# Altium PCB Copy of PCB1.PcbDoc (part 2 of 4)
Units mm, origin at the board's own origin, x right, y up, seen from the top; angles counter-clockwise.
Board outline 200 x 135 mm, 2 copper layers (Top Layer, Bottom Layer); 350 components, 150 nets, 843 pads, 244 vias.
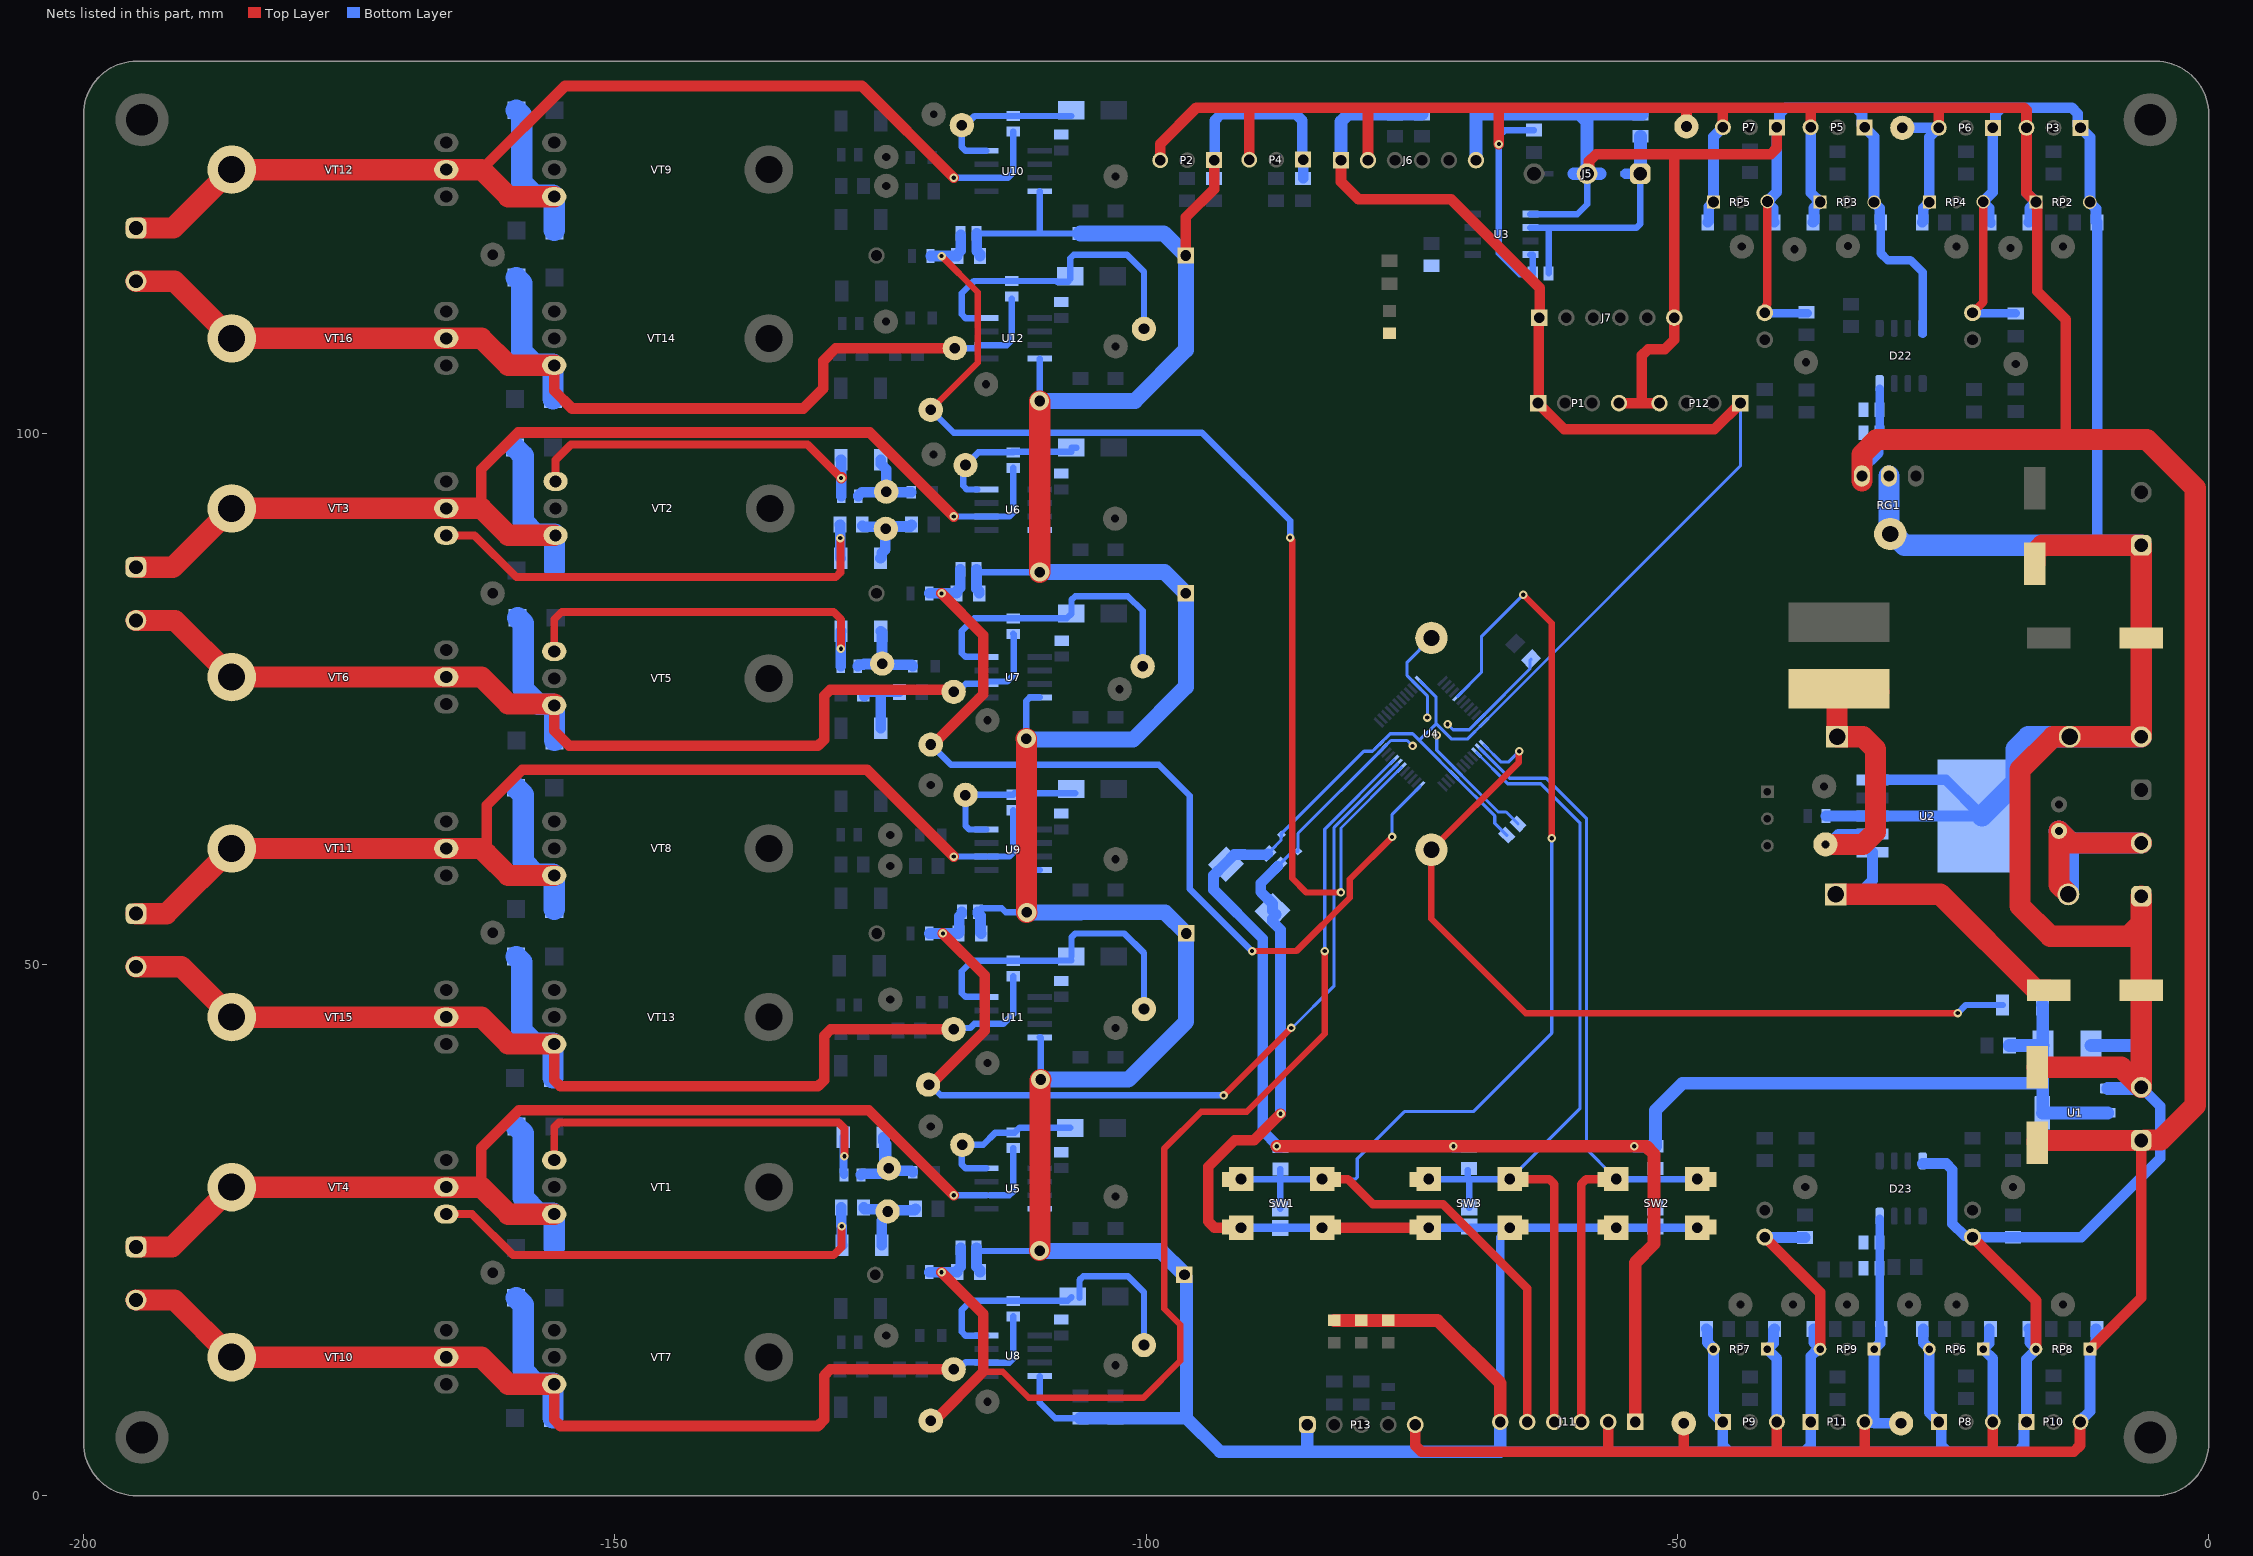
[diagram p2: the nets of this part, all layers, seen from the top]

## Part data
C1: library part CMP-04424-000193-1, "47uF 16V  ±20% 500mΩ 2312  SMD Tantalum Capacitor", Capacitance=47uF, Case Code (Imperial)=2312, Case Code (Metric)=6032, Case/Package=6032-28, ESR (Equivalent Series Resistance)=500mR, Leakage Current=7.5uA, Max Operating Temperature=125°C, Min Operating Temperature=-55°C, Package Quantity=1, Tolerance=20%, Voltage Rating=16V, Construction=Flat, Depth=3.2mm, Dissipation Factor=6%, Features="General Purpose", Height=2.8mm, Height - Seated (Max)=0.11inch, Lead Free="Lead Free", Length=6mm, Mount="Surface Mount", Number of Pins=2, Packaging="Tape and Reel", Polarity=Polar, Radiation Hardening=No, REACH SVHC="No SVHC", RoHS Compliant=Yes, Series=TAJ, Termination=SMD/SMT, Voltage Rating (DC)=16V, Width=3.2mm
C2 C3: library part CMP-05427-000015-1, "CAP ALUM 100UF 20% 50V SMD", Capacitance=100uF, Leakage Current=100uA, Manufacturer=Panasonic, Package=SF, Ripple Current=200mA, Temperature="-40°C to +85°C", Temperature Range High=+85°C, Temperature Range Low=-40°C, Tolerance=20%, Voltage=50V, Automotive=Yes, Automotive Grade="Grade 3", Category=Cap, ComponentLink2Description=Datasheet, ComponentLink2URL=https://industrial.panasonic.com/cdbs/www-data/pdf/RDE0000/ABA0000C1145.pdf, Device Class L1="Passive Components", Device Class L2=Capacitors, Device Class L3="Aluminum Electrolytic Capacitors", Digikey Description="CAP ALUM 100UF 20% 50V SMD", Dissipation Factor=0.12%, Height=10.5mm, Lead Free=Yes, Life=2000Hours, Manufacturer Part Number=EEE-1HA101UP, Material=Aluminum, Mouser Description="Cap Aluminum Lytic 100uF 50V 20% (8 X 10.2mm) SMD 200mA 2000h 85C Automotive T/R", Octopart=https://octopart.com/eee-1ha101up-panasonic-55396734, RoHS=TRUE, Voltage Rating=50V
C4 C5: "Capacitor Polarised", Manufacturer_Name=Panasonic, Datasheet Link=http://industrial.panasonic.com/cdbs/www-data/pdf/RDE0000/ABA0000C1142.pdf, Manufacturer_Part_Number=EEE1HA101AP
C6: "Capacitor Polarised", Manufacturer_Name=Vishay, Mouser Part Number=74-293D106X9050E2TE3, Arrow Part Number=293D106X9050E2TE3, Arrow Price/Stock=https://www.arrow.com/en/products/293d106x9050e2te3/vishay, Datasheet Link=http://www.vishay.com/doc?40002, Height=4.3mm, Manufacturer_Part_Number=293D106X9050E2TE3, Mouser Price/Stock=https://www.mouser.com/Search/Refine.aspx?Keyword=74-293D106X9050E2TE3
C7 C9 C11 C12 C13 C14 C15 C16: library part CMP-2007-03453-2, "Chip Multilayer Ceramic Capacitors for General Purpose, 0805, 10uF, X5R, 15%, 10%, 16V", Capacitance=10uF, Case Code (Imperial)=0805, Case Code (Metric)=2012, Dielectric=X5R, Max Operating Temperature=85°C, Min Operating Temperature=-55°C, Package Quantity=1, Tolerance=10%, Voltage=16V, Case/Package=0805, Depth=1.25mm, Height=1.25mm, Lead Free="Lead Free", Length=2mm, Material=Ceramic, Mount="Surface Mount", Packaging="Tape and Reel", Radiation Hardening=No, REACH SVHC="No SVHC", Termination=SMD/SMT, Thickness=0.053inch, Voltage Rating=16V, Voltage Rating (DC)=16V, Width=1.25mm
C8 C10 C17 C18 C19 C20 C21 C22 C23 C24 C25 C26 C27 C28 C29 C30 C31 C32 C33 C34 C35 C36: library part CMP-1036-04552-2, "CAP CER 0.22UF 50V X7R 0805", Capacitance="0.22 μF", Manufacturer=KEMET, Package=C0805C-DN, Temperature="-55°C to +125°C", Temperature Characteristic=X7R, Temperature Coefficient=30ppm/°C, Temperature Range High=+125°C, Temperature Range Low=-55°C, Tolerance=0.1, Voltage Rating="50 V", Automotive=No, Category=Cap, ComponentLink2Description=Datasheet, ComponentLink2URL=https://content.kemet.com/datasheets/KEM_C1003_C0G_SMD.pdf, Device Class L1="Passive Components", Device Class L2=Capacitors, Device Class L3="Ceramic Capacitors", Digikey Description="CAP CER 0.22UF 50V X7R 0805", Height=0.88mm, Ipc Land Pattern Name=CAPC200125X78, Lead Free=Yes, Manufacturer Part Number=C0805C224K5RACTU, Material=Ceramic, Mouser Description="CAP CER 0.22UF 50V X7R 0805", Octopart=https://octopart.com/c0805c224k5ractu-kemet-144670, RoHS=TRUE
CR1 CR2 U4: "No Description Available", Mfr_Name=STMicroelectronics, RefDes=RefDes
  CR1 CR2: Copyright="Copyright (C) 2022 Ultra Librarian. All rights reserved.", Manufacturer_Part_Number=1N5822RL, Type=DEV
  U4: Type=Type
D1 D2 D6 D10 D11 D12 D19 D20: library part CMP-12791-000009-1, "DIODE GEN PURP 400V 1A SMA", Capacitance=20pF, Forward Current=1A, Manufacturer="Diodes Inc.", Max Junction Temp=+150°C, Max Repetitive Reverse Voltage=400V, Max Surge Forward Current=30A, Package=SMA, Peak Reverse Current=5uA, Temperature="-65°C to +150°C", Temperature Range Low=-65°C, Automotive=No, Category=Diode, ComponentLink2Description=Datasheet, ComponentLink2URL=https://www.diodes.com/assets/Datasheets/ds16008.pdf, Device Class L1="Discrete Semiconductors", Device Class L2=Diodes, Device Class L3="Rectifier Diodes", Digikey Description="DIODE GEN PURP 400V 1A SMA", Footprint Url=https://www.diodes.com/assets/Package-Files/SMA.pdf, Height=2.4mm, Lead Free=Yes, Manufacturer Part Number=US1G-13-F, Mouser Description="Rectifiers 400V 1A", Octopart=https://octopart.com/us1g-13-f-diodes+inc.-334651, Reverse Voltage=400V, RoHS=TRUE, Standoff Height=0.05mm, Temperature Range High=+150°C
D3 D4 D5 D7 D8 D9 D13 D14 D15 D16 D17 D18 D21 D24 D25 D26 D27: library part CMP-249167-000001-1, "DIODE GEN PURP 75V 150MA SOD80", Capacitance=4pF, Forward Current=300mA, Manufacturer="Vishay Small Signal", Max Junction Temp=+175°C, Max Repetitive Reverse Voltage=100V, Max Surge Forward Current=2A, Package=6.560-5005.01-4, Peak Reverse Current=5uA, Reverse Voltage=75V, Temperature="to +175°C", Automotive=Yes, Automotive Grade="Grade 0", Category=Diode, ComponentLink2Description=Datasheet, ComponentLink2URL=http://www.vishay.com/docs/85557/ll4148.pdf, Device Class L1="Discrete Semiconductors", Device Class L2=Diodes, Device Class L3="Rectifier Diodes", Digikey Description="DIODE GEN PURP 75V 150MA SOD80", Height=1.6mm, Lead Free=Yes, Manufacturer Part Number=LL4448-GS08, Mouser Description="Diodes - General Purpose, Power, Switching 100 Volt 100mA", Octopart=https://octopart.com/ll4448-gs08-vishay+small+signal-40886, RoHS=TRUE, Temperature Range High=+175°C
D22 D23: "Микросхема сдвоенный ОУ", Package=8-SOIC, ComponentDescription="Микросхема сдвоенный ОУ, LMV358AIDR, 8-SOIC", ComponentTypе="Микросхема сдвоенный ОУ"
D28 D32 D33 D34 D35 D36 D37 D38 D39 D40 D41 D42 D43 D44 D45 D46: library part CMP-02540-000074-1, "DIODE GEN PURP 1KV 1A DO214BA", Average Rectified Current=1A, Case/Package=DO-214BA, Forward Voltage=1.2V, Max Forward Surge Current (Ifsm)=30A, Max Operating Temperature=175°C, Max Repetitive Reverse Voltage (Vrrm)=1kV, Max Reverse Current=5uA, Min Operating Temperature=-65°C, Package Quantity=1, Element Configuration=Single, Forward Current=1A, Height=2.74mm, Lead Free="Lead Free", Length=4.75mm, Max Reverse Voltage (DC)=1kV, Max Surge Current=30A, Mount="Surface Mount", Number of Pins=2, Packaging="Tape and Reel", Peak Non-Repetitive Surge Current=30A, Radiation Hardening=No, Recovery Time=3000ns, Reverse Recovery Time=2us, Reverse Recovery Time-Max=2s, Reverse Voltage=1kV, RoHS Compliant=Yes, Series=SUPERECTIFIER®, Width=2.9mm
D29 D30 D31 D47: "WURTH ELEKTRONIK - 151031YS06000 - LED, Yellow, Through Hole, T-1 (3mm), 30 mA, 2 V, 590 nm", Manufacturer_Name="Wurth Elektronik", Mouser Part Number=710-151031YS06000, Datasheet Link=https://katalog.we-online.de/led/datasheet/151031YS06000.pdf, Geometry.Height=5.5mm, Manufacturer_Part_Number=151031YS06000, Mouser Price/Stock=https://www.mouser.co.uk/ProductDetail/Wurth-Elektronik/151031YS06000?qs=LlUlMxKIyB3xSYYW%252BcuBiQ%3D%3D
D48: library part CMP-14400-000025-1, "DIODE ZENER 5.1V 300MW SOD323"
J1 J2 J3 J4 J8 J9 J10 J13: "WR-TBL Series 101 Horizontal Entry Modular, THT, pitch 5mm, 2p", Manufacturer="Wurth Elektronik", Operating Temperature Max=105°C, Operating Temperature Min=-40°C, Rated Current=16A, Working Voltage=250V, Application="Pressure Clamp", Category="Terminal Blocks", ComponentLink1Description="Website Link", ComponentLink1URL=https://www.we-online.com/redexpert/article/691101710002?ad, ComponentLink2Description="Datasheet Link", ComponentLink2URL=https://www.we-online.com/redexpert/spec/691101710002?ad, Manufacturer Part Number=691101710002, Match Code=WR-TBL, Modularity=Yes, Mount="Through Hole", Number of Pins=2, Number of Rows=1, Orientation=Horizontal, Packaging=Box, Pitch=5mm
J5: "WR-TBL Series 101 Horizontal Entry Modular, Through Hole, pitch 5mm, 3p", Manufacturer="Wurth Elektronik", Operating Temperature Max=105°C, Operating Temperature Min=-40°C, Rated Current=16A, Working Voltage=250V, Application="Pressure Clamp", Category="Terminal Blocks", ComponentLink1Description="Manufacturer Link", ComponentLink1URL=https://www.we-online.com/redexpert/article/691101710003?ad, ComponentLink2Description=Datasheet, ComponentLink2URL=https://www.we-online.com/redexpert/spec/691101710003?ad, Manufacturer Part Number=691101710003, Match Code=WR-TBL, Modularity=Yes, Mount="Through Hole", Orientation=Horizontal, Packaging=Box, PCB/Cable/Panel=PCB, Pin Number=3, Pitch=5mm
L1: library part 744776122, "WE-PD2 SMT Power Inductor, size 1054, 22µH, 2.04A, 0.1Ω", Case/Size Code=1054, DC Resistance=0.051Ω, DC Resistance Max=0.1Ω, Inductance=22µH, Manufacturer="Wurth Elektronik", Operating Temperature Max=125°C, Operating Temperature Min=-40°C, Rated Current=2.04A, Saturation Current=2.07A, Self Resonant Frequency=16MHz, Category="Unshielded Power Inductors", ComponentLink1Description="Website Link", ComponentLink1URL=https://www.we-online.com/redexpert/article/744776122?ad, ComponentLink2Description="Datasheet Link", ComponentLink2URL=https://www.we-online.com/redexpert/spec/744776122?ad, Height=5.4mm, Length=10mm, Manufacturer Part Number=744776122, Match Code=WE-PD2, Mount="Surface Mount", Packaging="Tape and Reel", Width=9mm
LED1 LED2 LED3 LED4: "THT LED round mono-color waterclear, WL-TMRW , Blue", Emitting color=Blue, Manufacturer="Wuerth Elektronik", ComponentLink1Description="Manufacturer URL", ComponentLink1URL=http://www.we-online.com, ComponentLink2Description=Datasheet, ComponentLink2URL=http://katalog.we-online.de/pbs/datasheet/7448042001.pdfhttp://katalog.we-online.de/pbs/datasheet/7448042001.pdfhttp://katalog.we-online.de/pbs/datasheet/7448042001.pdfhttp://katalog.we-online.de/pbs/datasheet/151033BS03000.pdf, PackageReference="Type 3mm", PartNumber=151033BS03000
P1 P12: library part CMP-1024-00357-1, "0.025\" SQ Post Header, Through-hole, Vertical, -55 to 125 degC, 2.54 mm Pitch, 4-Pin, Male, RoHS", Manufacturer=Samtec, Temperature Range="-55 to 125 degC", ComponentLink1Description="Manufacturer URL", ComponentLink1URL=http://www.samtec.com, ComponentLink2Description=Datasheet, ComponentLink2URL=http://www.samtec.com/documents/webfiles/pdf/TSW_TH.PDF, ComponentLink3Description="Package Specification", ComponentLink3URL=http://www.samtec.com/documents/webfiles/cpdf/TSW-XXX-XX-XXX-X-XX-XXX-MKT.pdf, DatasheetVersion=F-214, Mounting Technology=Through-hole, Orientation=Vertical, PackageDescription=".025[0.64] SQ. Post Terminal Strip Assembly", PackageReference=TSW-104-08-X-S, PackageVersion="DM, 8/1988", PartNumber=TSW-104-08-G-S, Pitch="2.54 mm", RoHS=True
P2 P3 P4 P5 P6 P7 P8 P9 P10 P11: "WR-WTB THT Male Vertical Locking Header, pitch 2.54mm, 3p", Contact Resistance=20mOhm, Operating Temperature="-40 to +105degC", Rated Current=3A, Withstanding Voltage=1000VAC, Working Voltage=250VAC, ComponentLink1Description=Manufacturer, ComponentLink1URL=http://www.we-online.de, ComponentLink2Description=Datasheet, ComponentLink2URL=https://www.we-online.com/catalog/datasheet/61900311121.pdf, Gender=Male, Mounting Technology=THT, Packaging=Bag, Part Number=61900311121, Pin Number=3, Pitch=2.54mm, Published Date="January 2020", Publisher="Wurth Elektronik", Type=Vertical
P13: "WR-PHD Pin Header, THT, Vertical, pitch 2.54mm, 1 Row, 5P", Contact Resistance=20mΩ, Manufacturer="Wurth Elektronik", Operating Temperature Max=105°C, Operating Temperature Min=-40°C, Rated Current=3A, Withstanding Voltage=500V, Working Voltage=250V, Category="Board-to-Board Connectors", ComponentLink1Description="Website Link", ComponentLink1URL=https://www.we-online.com/redexpert/article/61300511121?ad, ComponentLink2Description="Datasheet Link", ComponentLink2URL=https://www.we-online.com/redexpert/spec/61300511121?ad, Gender="Pin Header", Manufacturer Part Number=61300511121, Match Code=WR-PHD, Mount="Through Hole", Number of Pins=5, Number of Rows=1, Orientation=Vertical, Packaging=Bag, Pitch=2.54mm
R1 R2 R10 R12 R15 R16 R17 R23 R25 R26 R27 R28 R37 R45 R46 R48 R49 R51 R52 R53 R54 R55 R56 R57 R58 R59 R60 R66 R67 R71 R72 R73 R74 R76 R77 R79 R81 R83 R84 R85 R86 R87 R88 R93 R94 R97 R99 R100 R101 R102 R103 R104 R105 R106: library part CRCW08050000Z0EA
R3 R4 R5 R8 R9 R20 R22 R30 R33 R35 R36 R38 R39 R61 R62 R63 R64 R69 R70 R89 R90 R91 R92 R95 R96 R108 R110 R112 R113 R114 R115 R119: library part RC0805FR-07100KL
R6 R7 R11 R14 R19 R21 R31 R34 R41 R42 R43 R44 R65 R68 R75 R78: library part CMP-03412-028725-1, "RES SMD 10 OHM 1% 1/8W 0805", Manufacturer=Yageo, Package=RT0805, Power Rating=0.125W, Resistance=10Ω, Temperature="-55°C to +155°C", Temperature Coefficient="50 ppm/°C", Temperature Range High=+155°C, Temperature Range Low=-55°C, Tolerance=0.0001, Voltage Rating=150V, Automotive=No, Category=Res, ComponentLink2Description=Datasheet, ComponentLink2URL=http://www.yageo.com/documents/recent/PYu-RT_1-to-0.01_RoHS_L_9.pdf, Composition="Thin Film", Device Class L1="Passive Components", Device Class L2=Resistors, Device Class L3="Chip SMD Resistors", Digikey Description="RES SMD 10 OHM 1% 1/8W 0805", Footprint Url=http://www.yageo.com/exep/pages/download/literatures/PYu-R_Mount_10.pdf, Height=0.6mm, Ipc Land Pattern Name=RESC200125X50, Lead Free=Yes, Manufacturer Part Number=RT0805FRE0710RL, Mouser Description="High Precision-High Stability Chip Resistor Thin Film 0805 10Ohm 1% Paper T/R", Octopart=https://octopart.com/rt0805fre0710rl-yageo-39855890, RoHS=TRUE, Series=RT
R13 R18 R24 R40 R47 R50 R80 R82 R98 R116 R117 R118: library part CMP-2001-04908-2, "RES Thick Film, 10kΩ, 1%, 0.125W, 100ppm/°C, 0805", Case Code (Imperial)=0805, Case Code (Metric)=2012, Max Operating Temperature=155°C, Min Operating Temperature=-55°C, Package Quantity=5000, Power Rating=125mW, Resistance=10kR, Temperature Coefficient=100ppm/°C, Tolerance=1%, Voltage Rating=150V, Case/Package=0805, Composition="Thick Film", Contact Plating=Tin, Depth=1.25mm, Height=0.45mm, Lead Free="Lead Free", Length=2mm, Military Standard=Not, Packaging="Tape and Reel", Radiation Hardening=No, Termination=SMD/SMT, Voltage Rating (DC)=150V, Weight=0.000194oz, Width=1.25mm
R29 R32 R107 R109: library part CMP-03413-000003-1, "RES 1.2 OHM 5W 5% AXIAL", Manufacturer=Yageo, Manufacturer Part Number=SQP500JB-1R2, Package=SQP500, Power Rating=5W, Resistance=1.2Ω, Temperature="-55°C to +155°C", Temperature Coefficient=300ppm/°C, Temperature Range High=+155°C, Temperature Range Low=-55°C, Tolerance=5%, Voltage Rating=350V, Automotive=No, Category=Res, ComponentLink2Description=Datasheet, ComponentLink2URL=https://datasheet.ciiva.com/2723/yageolr-sqpnsp-2013-2723111.pdf, Composition=Wirewound, Device Class L1="Passive Components", Device Class L2=Resistors, Device Class L3="Through-Hole Resistors", Digikey Description="RES 1.2 OHM 5W 5% AXIAL", Height=10mm, Ipc Land Pattern Name=RESAD2911W100L2350D1050, Lead Free=Yes, Octopart=https://octopart.com/sqp500jb-1r2-yageo-1162571, RoHS=TRUE, Series=SQP
R111: library part RC0805FR-07100KL, "2.2K"
RG1: "REG IC REG LINEAR 5V 1A TO220AB", Current-Output=1A, Digikey Part Number=LM7805CT-ND, Manufacturer=Fairchild, Mouser Part Number=512-LM7805CT, Package=TO220, Part Number=LM7805CT, Temperature="-40°C to +125°C", Temperature Range High=+125°C, Temperature Range Low=-40°C, Voltage - Input (Max)=35V, Voltage - Output=5V, Voltage Dropout (Max)="2V @ 1A (Typ)", ComponentLink1Description=Upverter, ComponentLink1URL=https://upverter.com/upn/revision/b27a7358b7dd93a3/, ComponentLink2Description=Datasheet, ComponentLink2URL=https://www.fairchildsemi.com/datasheets/LM/LM7805.pdf, Digikey Description="REG IC REG LINEAR 5V 1A TO220AB", helpURL=https://upverter.com/upn/revision/b27a7358b7dd93a3/, Ipc Land Pattern Name=TO-220, Lead Free=yes, Price=0.384521982769, RoHS=TRUE, Supplier 1=Digi-Key, Supplier 2=Mouser, Supplier Part Number 1=LM7805CT-ND, Supplier Part Number 2=512-LM7805CT
RP1 RP2 RP3 RP4 RP5 RP6 RP7 RP8 RP9: library part 3296W-1-202LF
SW1 SW2 SW3: "No Description Available", Mfr_Name="TE Connectivity", Copyright="Copyright (C) 2022 Ultra Librarian. All rights reserved.", Manufacturer_Part_Number=4-1437565-2, RefDes=RefDes, Type=DEV
TP1 TP2 TP3 TP4 TP5 TP6 TP7 TP8 TP9 TP10 TP11 TP12 TP13 TP14 TP15 TP16 TP17 TP18 TP19 TP20 TP21 TP22 TP23 TP24 TP25 TP26 TP27 TP28 TP29 TP30 TP31 TP32 TP33 TP34 TP35 TP36 TP37 TP38 TP39 TP40 TP41 TP42 TP43 TP44 TP45 TP46 TP47 TP48 TP49 TP50 TP51 TP52 TP53 TP54 TP55 TP56 TP57 TP58 TP59 TP60 TP61 TP62 TP63 TP64 TP65 TP66 TP67 TP68 TP69 TP70: library part TP_PCB?, "Test_Point"
U1: library part CMP-0062-01639-4, "800mA Low-Dropout Linear Regulator, 4-pin SOT-223, Pb-Free", Manufacturer="Texas Instruments", PackageTopMarking=XYTT*N05A, PowerWise=N, Code_IPC=SOT223-4, Code_JEDEC=TO-261-AA, ComponentLink1Description="Datasheet URL", ComponentLink1URL=http://www.ti.com/general/docs/lit/getliterature.tsp?genericPartNumber=LM1117-N&fileType=pdf, CompType="LDO IC", High-Reliability=Y, PackageDescription="Molded SOT-223, 6.50 x 3.56 x 1.6mm Body, 4 Lead, 2.3mm Pitch", PackageReference=DCY0004A, PartNumber=LM1117MPX-3.3/NOPB, PinCount=4, RoHS=Y
U2: library part LM2576D2T-005G
U5 U6 U7 U8 U9 U10 U11 U12: "No Description Available", Mfr_Name=Infineon, Copyright="Copyright (C) 2023 Ultra Librarian. All rights reserved.", Manufacturer_Part_Number=IR2104SPBF, RefDes=RefDes, Type=DEV
VT1 VT2 VT3 VT4 VT5 VT6 VT7 VT8 VT9 VT10 VT11 VT12 VT13 VT14 VT15 VT16: "Транзистор МОП, одиночный, N-канальный", Package=TO-220(bend2), ChannelType=N-канальный, ComponentDescription="Транзистор МОП, одиночный, N-канальный, IRF3205, TO-220(bend2)", ComponentType="Транзистор МОП, одиночный"
Z1 Z2: "Zener Diode", Manufacturer_Name=onsemi, Mouser Part Number=863-MM3Z5V1ST1G, Arrow Part Number=MM3Z5V1ST1G, Arrow Price/Stock=https://www.arrow.com/en/products/mm3z5v1st1g/on-semiconductor?region=nac, Datasheet Link=http://www.onsemi.com/pub/Collateral/MM3Z2V4ST1-D.PDF, Height=1.1mm, Manufacturer_Part_Number=MM3Z5V1ST1G, Mouser Price/Stock=https://www.mouser.co.uk/ProductDetail/onsemi/MM3Z5V1ST1G?qs=HVbQlW5zcXXFXX%2FQxsNWFg%3D%3D

## Free pads (board coordinates)
  round 5 hole 3: 2(-194.5,5.5) 2(-194.5,129.5) 2(-5.5,129.5) t(-5.5,5.5)

## Via types
v1: diameter 0.8, hole 0.4, Top Layer to Bottom Layer, tented both sides, 119 vias
v2: diameter 1.27, hole 1, Top Layer to Bottom Layer, 115 vias
v3: diameter 1.8, hole 1, Top Layer to Bottom Layer, tented both sides, 6 vias
v4: diameter 1.27, hole 0.711, Top Layer to Bottom Layer, 3 vias
v5: diameter 0.8, hole 0.4, Top Layer to Bottom Layer, 1 vias

## Nets (pads, with @x,y where several pads share a name; then routed paths per layer and width w, separated by ;. In a path a pad name is that pad's centre, name@x,y a point inside that pad or via, vN(x,y) a via of type N, cw(c..) or ccw(c..) an arc to the next point about the centre after c; other vN are vias at no path point)
+3V3: C1.2 C6.1 C8.1 C10.1 D27.2 D48.1 J6.1 J7.1 J11.1 P1.1 P12.1 R3.2 R4.2 R10.2 R116.2 R117.2 R118.2 U1.2 U1.4 U4.9 U4.24 U4.36 U4.48 | length 312.4
  Top Layer w1: J6.1@-81.661,125.69 -81.661,123.658 -80.01,122.007 -71.307,122.007 -62.959,113.659 -62.959,111.152 -62.992,111.119 J7.1@-62.992,110.877 -63.056,110.813 -63.056,102.894 P1.1@-63.119,102.83 -60.664,100.375 -46.524,100.375 P12.1@-44.069,102.83
  Top Layer w1.2: v1(-87.705,32.888) v1(-54.067,32.888) -52.935,32.888 -52.197,32.15 -52.197,23.709 -53.975,21.931 v2(-53.975,6.945)
  Bottom Layer w0.3: C8.1@-88.224,60.752 -87.313,61.663 -87.313,61.946 -87.265,61.994 D48.1@-87.265,62.206 -87.313,62.254 -79.502,70.064 -78.692,70.064 U4.24@-78.102,70.654 -77.041,71.715 -74.92,71.715 -74.29,71.085 ; U4.36@-74.213,76.665 -72.708,75.16 -72.708,72.668 ; C10.1@-66.062,62.168 -67.183,63.288 -67.183,63.978 U4.9@-71.031,67.826 -73.559,70.355 -74.29,71.085 ; P12.1@-44.069,102.83 -44.069,96.909 U4.48@-68.202,72.776 -69.771,71.207 -71.247,71.207 -72.708,72.668 ; -74.29,71.085 -72.708,72.668
  Bottom Layer w1: C8.1@-88.658,60.318 -90.702,60.318 -90.737,60.353 -91.692,60.353 -92.553,59.493 -93.665,58.38 -93.665,57.049 -89.027,52.411 -89.027,34.353 -87.63,32.956 R116.2@-87.63,32.888
  Bottom Layer w1.2: v1(-87.705,32.888) -87.67,32.853 R116.2@-87.376,32.853 ; J6.1@-81.661,125.69 -81.661,129.34 -80.958,130.043 R4.2@-76.581,130.043 R3.2@-74.041,130.043 ; v1(-71.085,32.888) R118.2@-69.596,32.888 ; v1(-54.067,32.888) R117.2@-52.07,32.888 -52.07,36.282 -49.53,38.822 -15.744,38.822 -15.617,38.949 ; R10.2@-18.761,42.378 C1.2@-15.585,42.378 ; D27.2@-15.651,46.188 -15.626,46.163 -15.626,42.419 C1.2@-15.585,42.378 ; U1.2@-9.498,36.028 U1.4@-15.648,36.028 -15.617,36.059 -15.617,38.949 ; -15.617,38.949 -15.617,42.346 C1.2@-15.585,42.378
+5: C2.2 C24.1 C25.1 C26.1 C27.1 C28.1 D22.8 D23.8 J4.1 J6.2 J11.2 P2.3 P3.3 P4.3 P5.3 P6.3 P7.3 P8.3 P9.3 P10.3 P11.3 P13.5 R5.2 R56.2 R58.2 R72.2 R74.2 R87.2 R88.2 R99.2 R100.2 RG1.3 RP2.1 RP3.1 RP4.1 RP5.1 RP6.1 RP7.1 RP8.1 RP9.1 TP3.1 TP4.1 TP13.1 TP14.1 U1.3 U3.8 | length 476.3
  Top Layer w1: P2.3@-98.679,125.69 -98.679,127.221 -95.257,130.643 -90.297,130.643 ; P4.3@-90.297,125.736 -90.297,130.643 ; J6.2@-79.121,125.69 -79.121,130.643 ; P13.5@-74.676,6.691 -74.676,4.737 -74.09,4.151 -56.515,4.151 ; v1(-66.802,127.214) -66.802,130.643 ; v2(-56.515,6.945) -56.515,4.151 ; v2(-49.403,6.818) -49.403,4.151 ; v2(-49.149,128.865) -49.149,130.643 ; P7.3@-45.72,128.784 -45.72,130.643 -49.149,130.643 ; -45.602,130.643 -25.273,130.643 ; -40.64,4.271 P9.3@-40.64,6.818 ; P5.3@-37.465,128.784 -37.465,130.516 ; P11.3@-32.385,6.818 -32.385,4.151 ; P6.3@-25.4,128.738 -25.4,130.516 -25.273,130.643 ; -20.32,4.237 v2(-20.32,6.945) ; RP2.1@-16.156,121.653 -16.156,121.16 -16.129,121.133 -16.129,113.371 -13.462,110.704 -13.462,99.401 ; RP2.1@-16.129,121.626 -17.145,122.642 P3.3@-17.145,128.738 -17.145,130.389 -17.399,130.643 -25.273,130.643 ; v2(-12.065,6.945) -12.114,6.896 -12.114,4.737 -12.7,4.151 -32.385,4.151 ; RP8.1@-11.176,13.803 -6.35,18.629 J4.1@-6.35,33.441 ; -90.297,130.643 -79.121,130.643 ; -79.121,130.643 -66.802,130.643 ; -66.802,130.643 -49.149,130.643 ; -56.515,4.151 -49.403,4.151 ; -49.403,4.151 -32.385,4.151
  Top Layer w2: RG1.3@-32.639,95.514 RG1.3@-32.639,95.972 -32.639,98.004 -31.242,99.401 -13.462,99.401 -5.826,99.401 -1.27,94.845 -1.27,36.73 -4.512,33.488 -6.017,33.488 -6.064,33.441 J4.1@-6.35,33.441 -16.129,33.441 C2.2@-16.129,33.234
  Bottom Layer w0.6: U3.8@-63.836,116.8 -63.64,116.8 -63.615,116.775 C28.1@-63.615,115.022 ; C28.1@-63.615,114.968 -64.843,114.968 -66.802,116.927 v1(-66.802,127.214) -66.802,127.933 -66.216,128.519 R5.2@-63.5,128.519
  Bottom Layer w0.8: RG1.3@-32.639,95.972 -32.639,96.48 -31,98.119 C24.1@-31,100.036 ; D23.8@-30.981,26.062 -30.981,15.863 R100.2@-30.826,15.708 ; C24.1@-30.981,100.043 D22.8@-30.981,104.167
  Bottom Layer w1: R74.2@-47.152,119.848 -47.049,119.951 -47.049,121.313 v2(-46.609,121.753) -46.609,127.895 P7.3@-45.72,128.784 ; R88.2@-40.859,15.708 -40.962,15.605 -40.962,14.37 RP7.1@-41.529,13.803 -40.64,12.914 v2(-40.64,6.945) P9.3@-40.64,6.818 ; P5.3@-37.465,128.784 -37.465,122.642 v2(-36.576,121.753) -37.143,121.186 -37.143,119.951 R58.2@-37.246,119.848 ; v2(-32.385,6.945) -32.322,6.882 -31.496,6.882 ; R100.2@-30.929,15.708 -30.929,14.37 RP9.1@-31.496,13.803 -31.496,6.882 ; v2(-28.956,6.818) -31.433,6.818 -31.496,6.882 ; v2(-28.829,128.738) P6.3@-25.4,128.738 -26.289,127.849 v2(-26.289,121.748) -26.856,121.181 -26.856,119.951 R72.2@-26.959,119.848 ; R87.2@-20.642,15.708 -20.642,14.37 RP6.1@-21.209,13.803 -21.109,13.703 -20.32,12.914 v2(-20.32,6.945) ; P3.3@-17.145,128.738 -17.145,122.642 v2(-16.256,121.753) -16.823,121.186 -16.823,119.951 R56.2@-16.926,119.848 ; v2(-12.065,6.945) -12.065,7.08 -11.176,7.969 RP8.1@-11.176,13.803 -10.609,14.37 R99.2@-10.609,15.708
  Bottom Layer w1.2: U1.3@-9.498,33.728 -6.637,33.728 J4.1@-6.35,33.441
GND: BT1.1 C1.1 C2.1 C3.1 C4.2 C5.2 C6.2 C8.2 C10.2 C17.1 C18.1 C19.1 C20.2 C21.2 C22.2 C23.2 C24.2 C25.2 C26.2 C27.2 C29.2 C30.2 C31.2 C32.2 C33.2 C34.2 C35.2 C36.2 CR2.2 D22.4 D23.4 D29.2 D30.2 D31.2 D47.2 D48.2 J1.1 J2.1 J4.2 J5.2 J6.6 J7.6 J11.6 J13.2 LED1.1 LED2.1 LED3.1 LED4.1 P1.4 P2.1 P3.1 P4.1 P5.1 P6.1 P7.1 P8.1 P9.1 P10.1 P11.1 P12.4 P13.1 R1.1 R2.2 R8.1 R9.1 R12.1 R13.1 R17.1 R18.1 R22.2 R23.1 R24.1 R29.1 R32.1 R35.1 R36.1 R37.1 R39.2 R40.1 R46.1 R47.1 R49.1 R50.1 R66.1 R67.1 R69.1 R70.1 R76.2 R77.2 R79.1 R80.1 R81.1 R82.1 R93.1 R94.1 R95.1 R96.1 R101.2 R102.2 R107.1 R109.1 R111.1 R112.1 RG1.2 RP2.3 RP3.3 RP4.3 RP5.3 RP6.3 RP7.3 RP8.3 RP9.3 SW1.1 SW1.2 SW2.1 SW2.2 SW3.1 SW3.2 U1.1 U2.3 U2.5 U2.6 U3.5 U4.8 U4.23 U4.35 U4.47 U5.4 U6.4 U7.4 U8.4 U9.4 U10.4 U11.4 U12.4 Z1.2 Z2.2 | length 1101.6
  Top Layer w0.8: LED2.1@-41.783,111.334 -41.63,111.487 -41.63,112.053 -41.529,112.154 RP5.3@-41.529,121.753 ; v2(-22.225,111.339) -21.209,112.355 RP4.3@-21.209,121.748
  Top Layer w1: R109.1@-96.266,116.723 -96.266,120.307 -93.599,122.974 P2.1@-93.599,125.69 ; v2(-91.059,25.233) -93.564,25.233 -94.15,25.819 -94.15,30.975 -91.675,33.45 -89.85,33.45 v1(-87.35,35.95) ; v2(-83.439,25.233) -82.702,25.233 v2(-73.406,25.233) ; J5.2@-58.5,124.42 -58.318,124.602 -58.318,125.584 -57.655,126.247 -50.292,126.247 ; P1.4@-55.499,102.83 -53.34,102.83 ; P12.4@-51.689,102.83 -53.34,102.83 ; v2(-41.783,24.344) -36.576,19.137 RP9.3@-36.576,13.803 ; P7.1@-40.64,128.784 -40.64,126.833 -41.226,126.247 -50.292,126.247 ; v2(-22.225,24.344) -16.256,18.375 RP8.3@-16.256,13.803 ; RP2.3@-11.167,121.69 RP2.3@-11.113,121.69 ; -53.34,102.83 -53.34,107.324 -52.754,107.91 -51.181,107.91 -50.292,108.799 J7.6@-50.292,110.877 -50.292,126.247
  Top Layer w1.2: P13.1@-84.836,6.691 P13.1@-84.802,6.725 ; D31.2@-82.296,16.504 D30.2@-79.756,16.504 D29.2@-77.216,16.504 -72.579,16.504 -66.675,10.6 v2(-66.675,6.945)
  Top Layer w2: v3(-111.275,71.25) -111.25,71.225 -111.25,54.925 v3(-111.225,54.9) ; v3(-110.025,23.075) -109.982,23.118 -109.982,39.118 v3(-109.925,39.175) ; v3(-110.025,103.025) -110.008,103.008 v3(-110.008,86.92) ; C3.1@-16.383,87.723 -16.383,88.723 -15.658,89.448 J1.1@-6.35,89.448 C5.2@-6.35,80.732 J13.2@-6.35,71.432 CR2.2@-13.08,71.432 -13.091,71.421 -14.654,71.421 -17.75,68.325 -17.75,55.5 -14.915,52.665 -7.522,52.665 -6.35,53.837 ; C2.1@-16.129,40.334 -8.243,40.334 J4.2@-6.35,38.441 C4.2@-6.35,47.585 -6.35,53.837 ; J2.1@-6.35,56.428 -6.35,53.837
  Bottom Layer w0.3: C8.2@-87.481,59.374 -86.204,60.65 D48.2@-85.709,60.65 -85.709,62.34 U4.23@-77.748,70.301 -76.969,71.08 -75.438,71.08 v1@-74.947,70.589 ; v1(-73.533,73.239) -73.533,75.278 U4.35@-74.566,76.311 -75.438,77.183 -75.438,78.446 BT1.1@-73.152,80.732 ; v1(-72.644,71.588) -72.644,70.146 U4.8@-70.677,68.179 ; v1@-71.611,72.587 -71.12,72.096 -69.589,72.096 U4.47@-68.556,73.129 -63.88,77.805 -63.88,78.612 R2.2@-63.773,78.719 ; U4.8@-70.67,68.169 -70.297,67.796 -70.297,67.781 -66.865,64.349 -66.122,64.349 C10.2@-65.002,63.228
  Bottom Layer w0.6: C22.2@-115.928,118.797 -110.008,118.797 ; C20.2@-115.824,23.039 v3@-110.008,23.039 ; C21.2@-115.697,86.92 v3(-110.008,86.92) U6.4@-110.008,90.892 ; C23.2@-115.51,55.277 -113.583,55.277 -113.206,54.9 v3(-111.225,54.9) -111.217,54.908 -111.198,54.927 -111.198,58.537 -110.846,58.888 U9.4@-110.008,58.888 ; v3(-111.275,71.25) v3@-111.236,71.211 ; v3@-111.275,71.262 -111.275,74.793 -110.924,75.144 U7.4@-110.008,75.144 ; U8.4@-110.008,11.263 -110.008,8.749 -108.55,7.291 R40.1@-106.172,7.291 ; U5.4@-110.008,27.011 -110.025,26.994 v3(-110.025,23.075) v3@-109.989,23.039 ; U11.4@-110.008,43.14 -109.946,43.14 -109.925,43.119 v3(-109.925,39.175) ; U12.4@-110.008,107.021 -110.025,107.004 -110.025,103.073 v3@-110.001,103.049 ; U10.4@-110.008,122.769 -110.008,118.797 ; R47.1@-106.18,54.908 R47.1@-106.172,54.916 ; R50.1@-106.172,118.797 -110.008,118.797 ; U3.5@-63.836,120.61 -59.436,120.61 -58.5,121.546 J5.2@-58.5,124.42
  Bottom Layer w0.8: v2(-91.059,25.233) v2(-83.439,25.233) ; v2(-73.406,25.233) -69.596,25.233 v2(-65.786,25.233) ; v2(-66.675,6.945) -66.675,24.344 v2(-65.786,25.233) ; v2(-48.133,25.233) -52.07,25.233 v2(-55.753,25.233) v2(-65.786,25.233) ; LED2.1@-41.749,111.3 R70.1@-37.753,111.3 ; R67.1@-30.964,119.951 R67.1@-30.861,119.848 -30.861,116.927 -30.226,116.292 -28.067,116.292 -26.931,115.156 D22.4@-26.931,109.875 D22.4@-26.931,109.367 ; v2(-22.225,111.339) -22.191,111.305 -18.195,111.305 R69.1@-18.161,111.272 ; R76.2@-20.574,119.848 R76.2@-20.447,119.721
  Bottom Layer w1: C20.2@-115.963,23.328 -115.963,21.544 -115.637,21.218 R35.1@-115.637,21.042 ; C21.2@-115.963,87.209 -115.963,85.365 -115.697,85.099 R36.1@-115.697,84.923 ; C22.2@-115.938,118.797 -115.938,117.15 -115.637,116.849 R112.1@-115.637,116.673 ; C23.2@-115.836,54.951 -115.836,54.801 -115.811,54.776 -115.775,54.776 -115.588,54.59 -115.588,52.997 R111.1@-115.51,52.919 ; R22.2@-93.599,123.982 P2.1@-93.599,125.69 -93.551,125.738 -93.551,129.422 -92.965,130.008 -85.897,130.008 -85.311,129.422 -85.311,125.83 P4.1@-85.217,125.736 R39.2@-85.217,123.982 ; C6.2@-88.105,55.045 -88.105,55.735 -89.198,56.828 -89.198,57.656 C8.2@-87.604,59.25 ; C6.2@-87.759,54.699 -88.14,54.318 -88.14,54.055 -87.35,53.265 v1(-87.35,35.95) ; -66.675,4.151 -45.134,4.151 ; R94.1@-47.279,15.708 -47.176,15.605 -47.176,14.424 -46.609,13.857 RP7.3@-46.609,13.803 -46.609,7.707 -45.72,6.818 -45.72,4.737 -45.134,4.151 ; v2(-41.783,24.344) -41.748,24.309 R96.1@-37.973,24.309 ; R77.2@-40.894,119.848 -40.997,119.951 -40.997,121.167 -41.529,121.699 RP5.3@-41.529,121.753 v2(-41.529,121.807) -40.64,122.696 P7.1@-40.64,128.784 -40.39,129.034 -40.39,130.057 -39.804,130.643 -33.221,130.643 ; R102.2@-37.143,15.708 -37.143,14.424 -36.576,13.857 RP9.3@-36.576,13.803 -36.614,13.765 -36.817,13.765 -37.465,13.117 v2(-37.465,6.945) -37.465,4.737 -38.051,4.151 ; R1.1@-36.017,63.968 U2.3@-31.641,63.968 U2.6@-21.336,63.968 -24.74,67.372 U2.5@-31.641,67.372 ; RP3.3@-31.496,121.753 -31.496,121.699 -30.964,121.167 R67.1@-30.964,119.951 ; RP3.3@-31.496,121.807 -31.496,127.895 P5.1@-32.385,128.784 -32.635,129.034 -32.635,130.057 -33.221,130.643 ; D23.4@-26.931,31.262 -26.924,31.269 -24.716,31.269 -24.13,30.683 -24.13,25.614 -22.975,24.459 -22.34,24.459 v2(-22.225,24.344) ; R93.1@-26.856,15.708 -26.856,14.424 -26.289,13.857 RP6.3@-26.289,13.803 -26.289,7.834 v2(-25.4,6.945) -25.158,6.703 -25.158,4.737 -24.573,4.151 ; LED3.1@-22.208,24.327 R95.1@-18.432,24.327 -11.995,24.327 -4.572,31.75 -4.572,36.663 J4.2@-6.35,38.441 ; R76.2@-20.574,119.848 -20.677,119.951 -20.677,121.162 -21.209,121.694 RP4.3@-21.209,121.748 -21.209,121.802 -20.32,122.691 P6.1@-20.32,128.738 -20.07,128.988 -20.07,130.057 -19.484,130.643 ; R101.2@-16.926,15.708 -16.823,15.605 -16.823,14.424 -16.256,13.857 RP8.3@-16.256,13.803 -16.256,13.749 -17.145,12.86 v2(-17.145,6.945) -17.387,6.703 -17.387,4.737 -17.972,4.151 -24.573,4.151 ; v2(-11.176,121.753) -11.176,121.699 -10.609,121.132 -10.609,119.951 R66.1@-10.506,119.848 -10.506,89.448 ; RP2.3@-11.176,121.807 -11.176,127.849 P3.1@-12.065,128.738 -12.315,128.988 -12.315,130.057 -12.901,130.643 -19.484,130.643 ; -45.134,4.151 -38.051,4.151 ; -38.051,4.151 -24.573,4.151 ; -33.221,130.643 -19.484,130.643
  Bottom Layer w1.2: v3(-110.025,103.025) -110.001,103.049 v3@-109.998,103.046 ; R82.1@-106.175,103.046 R82.1@-106.172,103.049 ; R40.1@-106.172,7.291 R37.1@-102.87,7.291 -96.203,7.291 ; R29.1@-96.393,20.788 -96.218,20.613 -96.218,19.925 -96.203,19.91 -96.203,7.291 ; P13.1@-84.836,6.691 -84.836,4.151 ; J6.6@-68.961,125.69 -68.961,130.008 -59.203,130.008 ; v2(-66.675,6.945) -66.675,4.151 -84.836,4.151 ; Z2.2@-59.76,124.42 J5.2@-58.5,124.42 ; Z1.2@-57.264,124.42 J5.2@-58.5,124.42 ; R8.1@-53.34,130.008 -59.203,130.008 ; C1.1@-11.085,42.378 -6.926,42.378 -6.223,41.675 -6.223,38.568 J4.2@-6.35,38.441 -6.463,38.328 U1.1@-9.498,38.328 ; -96.203,7.291 -93.063,4.151 -84.836,4.151 ; -59.203,130.008 -58.5,129.305 J5.2@-58.5,124.42
  Bottom Layer w1.5: v3@-111.217,54.908 R47.1@-106.18,54.908 ; v3@-111.197,71.172 R24.1@-106.172,71.172 R23.1@-102.87,71.172 -101.222,71.172 -96.266,76.128 R32.1@-96.266,84.846 ; v3(-110.008,86.92) R13.1@-106.172,86.92 R12.1@-102.87,86.92 -98.263,86.92 R32.1@-96.266,84.923 ; v3@-109.998,103.046 R82.1@-106.175,103.046 ; v3@-109.989,23.039 R18.1@-106.172,23.039 R17.1@-102.87,23.039 -98.617,23.039 R29.1@-96.568,20.991 ; v3(-109.925,39.175) R80.1@-106.179,39.175 ; R80.1@-106.172,39.168 R79.1@-102.87,39.168 -101.682,39.168 -96.239,44.611 R107.1@-96.239,52.919 -98.236,54.916 R46.1@-102.87,54.916 R47.1@-106.172,54.916 ; R82.1@-106.172,103.049 R81.1@-102.87,103.049 -101.051,103.049 -96.266,107.834 R109.1@-96.266,116.723 -98.34,118.797 R49.1@-102.87,118.797 R50.1@-106.172,118.797
  Bottom Layer w2: RG1.2@-30.099,95.972 -30.093,95.966 RG1.2@-30.093,91.013 ; RG1.2@-29.972,90.511 -29.688,90.511 -28.625,89.448 -10.506,89.448 J1.1@-6.35,89.448 ; U2.6@-21.336,63.968 -18.146,67.158 -18.146,70.26 -16.974,71.432 CR2.2@-13.08,71.432 J13.2@-6.35,71.432
  other v1: -74.93,70.572 -71.628,72.604
  other v2: -45.72,6.945 -31.496,121.748 -21.209,121.775
NetBT1_2: BT1.2 D27.1 U4.1 | length 81.3
  Top Layer w0.6: v1@-64.934,70.027 -64.934,69.011 BT1.2@-73.152,60.793 -73.152,54.316 -64.262,45.426 v1(-23.622,45.426)
  Bottom Layer w0.3: U4.1@-68.202,70.654 -66.596,69.048 -65.913,69.048 v1(-64.897,70.064)
  Bottom Layer w0.6: v1(-23.622,45.426) -22.86,46.188 D27.1@-19.401,46.188
NetC4_1: C4.1 CR1.1 U2.1 | length 30.4
  Top Layer w2: CR1.1@-35.103,56.602 -25.273,56.602 -16.256,47.585 C4.1@-15.05,47.585
  Bottom Layer w1: CR1.1@-35.103,56.602 -32.948,56.602 -31.641,57.909 U2.1@-31.641,60.564
NetC7_1: C7.1 D2.1 TP24.1 U6.8 | length 14.6
  Bottom Layer w0.6: TP24.1@-117.227,97.115 -117.227,95.053 -116.875,94.702 U6.8@-115.871,94.702 ; v2(-117,97) -116.994,97 -115.806,98.188 C7.1@-112.522,98.188 ; C7.1@-112.592,98.258 D2.1@-107.029,98.258 ; D2.1@-107.029,98.639 D2.1@-106.553,98.639
NetC7_2: C7.2 D39.2 D40.1 J3.1 U6.6 VT2.S VT3.D | length 119.6
  Top Layer w1: -162.56,92.924 -162.56,96.607 -159.103,100.064 -126.012,100.064 v1(-118.11,92.162)
  Top Layer w2: J3.1@-195.072,87.383 -191.596,87.383 VT3.D@-186.055,92.924 VT3.D@-165.862,92.924 -162.56,92.924 -160.02,90.384 VT2.S@-155.702,90.384
  Bottom Layer w0.6: v1(-118.11,92.162) U6.6@-115.036,92.162 ; U6.6@-114.909,92.162 -112.873,92.162 -112.522,92.513 C7.2@-112.522,96.734
  Bottom Layer w2: D39.2@-159.397,98.639 -158.623,97.865 -158.623,91.667 -157.451,90.495 -155.686,90.495 VT2.S@-155.575,90.384 -155.579,90.384 -155.69,90.273 D40.1@-155.69,87.082
NetC9_1: C9.1 D1.1 TP23.1 U5.8 | length 15.1
  Bottom Layer w0.6: U5.8@-115.036,30.821 -116.997,30.821 -117.348,31.172 -117.348,32.977 v2(-117.3,33.025) -115.338,33.025 -114.183,34.18 C9.1@-112.522,34.18 -112.37,34.18 -111.919,34.631 D1.1@-107.156,34.631
NetC9_2: C9.2 D28.2 D32.1 J8.1 U5.6 VT1.S VT4.D | length 118.8
  Top Layer w1: -162.56,29.043 -162.56,32.726 -159.018,36.268 -126.097,36.268 v1(-118.11,28.281)
  Top Layer w2: J8.1@-195.064,23.415 -191.683,23.415 VT4.D@-186.055,29.043 VT4.D@-165.862,29.043 -162.56,29.043 -160.02,26.503 VT1.S@-155.702,26.503
  Bottom Layer w0.6: v1(-118.11,28.281) U5.6@-115.036,28.281 ; U5.6@-114.655,28.281 -112.873,28.281 -112.522,28.632 C9.2@-112.522,32.726
  Bottom Layer w2: D28.2@-159.27,34.758 -158.623,34.111 -158.623,28.04 -157.197,26.614 -155.813,26.614 VT1.S@-155.702,26.503 D32.1@-155.702,23.328
NetC11_1: C11.1 D6.1 TP34.1 U7.8 | length 28.6
  Bottom Layer w0.6: U7.8@-115.871,78.954 -116.997,78.954 -117.348,79.305 -117.348,81.388 -116.169,82.567 C11.1@-112.522,82.567 -107.48,82.567 D6.1@-107.029,83.018 -107.029,84.318 -106.678,84.669 -101.719,84.669 -100.33,83.28 v2(-100.33,78.065)
NetC11_2: C11.2 D41.2 D42.1 J3.2 TP40.1 U7.6 VT5.S VT6.D | length 111.9
  Top Layer w1: VT5.S@-155.702,74.382 -155.702,71.993 -154.281,70.572 -130.888,70.572 -130.302,71.158 -130.302,75.281 -129.716,75.867 -118.325,75.867 v2(-118.11,75.652)
  Top Layer w2: J3.2@-195.072,82.383 -191.389,82.383 VT6.D@-186.055,77.049 VT6.D@-165.862,77.049 -162.56,77.049 -160.02,74.509 VT5.S@-155.702,74.509
  Bottom Layer w0.6: v2(-118.11,75.652) -117.742,75.652 -116.98,76.414 U7.6@-115.036,76.414 -114.815,76.635 -113.061,76.635 -112.475,77.221 -112.475,81.092 -112.496,81.113 C11.2@-112.522,81.113
  Bottom Layer w2: D41.2@-159.143,82.637 -158.623,82.117 -158.623,75.906 -157.21,74.493 -155.813,74.493 -155.69,74.37 D42.1@-155.69,71.08
NetC12_1: C12.1 D10.1 TP33.1 U8.8 | length 28.8
  Bottom Layer w0.6: U8.8@-115.036,15.073 -116.997,15.073 -117.348,15.424 -117.348,17.486 -116.494,18.34 C12.1@-112.522,18.34 -107.38,18.34 D10.1@-107.029,18.692 ; D10.1@-106.267,18.629 -106.267,20.31 -105.916,20.661 -103.251,20.661 -101.711,20.661 -100.203,19.153 v2(-100.203,14.184)
NetC12_2: C12.2 D33.2 D34.1 J8.2 TP39.1 U8.6 VT7.S VT10.D | length 112
  Top Layer w1: VT7.S@-155.702,10.501 -155.702,7.15 -155.116,6.564 -130.888,6.564 -130.302,7.15 -130.302,11.312 -129.716,11.898 v2(-118.11,11.898)
  Top Layer w2: J8.2@-195.064,18.415 -191.429,18.415 VT10.D@-186.055,13.041 VT10.D@-165.862,13.041 -162.56,13.041 -160.02,10.501 VT7.S@-155.702,10.501
  Bottom Layer w0.6: v2(-118.11,11.898) -117.654,11.898 -116.996,12.556 U8.6@-115.059,12.556 ; U8.6@-114.782,12.533 -112.873,12.533 -112.522,12.884 C12.2@-112.522,16.886
  Bottom Layer w2: D33.2@-159.282,18.629 -158.623,17.97 -158.623,11.784 -157.451,10.612 -155.813,10.612 VT7.S@-155.702,10.501 -155.718,10.501 -155.829,10.39 D34.1@-155.829,7.326
NetC13_1: C13.1 D11.1 TP47.1 U9.8 | length 15.5
  Bottom Layer w0.6: v2(-117.025,65.937) TP47.1@-116.997,65.965 ; U9.8@-115.036,62.698 -116.645,62.698 -116.997,63.049 TP47.1@-116.997,65.965 ; C13.1@-112.557,65.965 -112.395,66.127 D11.1@-106.68,66.127 ; C13.1@-112.522,65.965 TP47.1@-116.997,65.965
NetC13_2: C13.2 D35.2 D36.1 J9.1 U9.6 VT8.S VT11.D | length 119.6
  Top Layer w1: -162.052,60.412 -162.052,64.984 -158.722,68.314 -126.266,68.314 v1(-118.11,60.158)
  Top Layer w2: J9.1@-195.064,54.784 -192.191,54.784 VT11.D@-186.055,60.92 VT11.D@-165.862,60.92 -162.56,60.92 -162.052,60.412 -160.02,58.38 VT8.S@-155.702,58.38
  Bottom Layer w0.6: v1(-118.11,60.158) U9.6@-115.036,60.158 ; U9.6@-114.782,60.158 -112.873,60.158 -112.522,60.509 C13.2@-112.522,64.511
  Bottom Layer w2: D35.2@-159.282,66.635 -158.623,65.976 -158.623,59.663 -157.451,58.491 -155.813,58.491 VT8.S@-155.702,58.38 D36.1@-155.702,55.205
NetC14_1: C14.1 D12.1 TP48.1 U10.8 | length 15.7
  Bottom Layer w0.6: U10.8@-115.036,126.579 -116.997,126.579 ; D12.1@-107.025,129.846 C14.1@-112.522,129.846 -116.154,129.846 -117.008,128.992 v4(-117.348,128.992) -117.348,126.93 ; -117.348,126.93 -117.172,126.755 -116.997,126.579 ; -117.348,126.93 -116.997,126.579
  other v2: -117.348,128.992
NetC14_2: C14.2 D43.2 D44.1 J10.1 U10.6 VT9.S VT12.D | length 117.4
  Top Layer w1: -162.56,124.801 -154.686,132.675 -126.746,132.675 v1(-118.11,124.039)
  Top Layer w2: J10.1@-195.064,119.3 -191.556,119.3 VT12.D@-186.055,124.801 VT12.D@-165.862,124.801 -162.56,124.801 -160.02,122.261 VT9.S@-155.702,122.261
  Bottom Layer w0.6: VT9.S@-155.702,122.261 VT9.S@-155.696,122.255 ; D44.1@-155.696,119.092 D44.1@-155.69,119.086 ; v1(-118.11,124.039) U10.6@-115.036,124.039 -113,124.039 -112.522,124.517 C14.2@-112.522,128.392
  Bottom Layer w1: VT9.S@-155.851,122.41 VT9.S@-155.702,122.261
  Bottom Layer w2: D43.2@-159.27,130.389 -158.75,129.869 -158.75,123.581 -157.578,122.41 VT9.S@-155.851,122.41 ; D44.1@-155.696,119.092 VT9.S@-155.696,122.255
NetC15_1: C15.1 D19.1 TP57.1 U11.8 | length 30.1
  Bottom Layer w0.6: U11.8@-115.036,46.95 -116.997,46.95 -117.348,47.301 -117.348,49.363 -116.367,50.344 C15.1@-112.522,50.344 -108.315,50.344 -108.35,50.379 D19.1@-107.061,50.379 ; D19.1@-107.029,50.76 -107.029,52.568 -106.678,52.919 -102.044,52.919 -100.203,51.078 v2(-100.203,45.807)
NetC15_2: C15.2 D37.2 D38.1 J9.2 TP63.1 U11.6 VT13.S VT15.D | length 112
  Top Layer w1: VT13.S@-155.702,42.505 -155.702,39.112 -155.116,38.526 -130.888,38.526 -130.302,39.112 -130.302,43.267 -129.667,43.902 v2(-118.11,43.902)
  Top Layer w2: J9.2@-195.064,49.784 -190.794,49.784 VT15.D@-186.055,45.045 VT15.D@-165.862,45.045 -162.56,45.045 -160.02,42.505 VT13.S@-155.702,42.505
  Bottom Layer w0.6: v2(-118.11,43.902) -117.987,44.025 -116.544,44.025 -116.159,44.41 U11.6@-115.036,44.41 -115.015,44.431 -113.419,44.431 -112.522,45.328 C15.2@-112.522,48.89
  Bottom Layer w2: D37.2@-159.282,50.76 -158.75,50.228 -158.75,43.788 -157.578,42.616 -155.813,42.616 VT13.S@-155.702,42.505 -155.718,42.505 -155.829,42.394 D38.1@-155.829,39.33
NetC16_1: C16.1 D20.1 TP58.1 U12.8 | length 29.2
  Bottom Layer w0.6: U12.8@-115.871,110.831 -116.997,110.831 -117.348,111.182 -117.348,113.165 -116.196,114.317 C16.1@-112.649,114.317 -108.442,114.317 -108.385,114.26 D20.1@-107.315,114.26 ; D20.1@-107.156,114.514 D20.1@-107.156,114.768 -107.156,116.449 -106.805,116.8 -101.8,116.8 -100.203,115.203 v2(-100.203,109.815)
NetC16_2: C16.2 D45.2 D46.1 J10.2 TP64.1 U12.6 VT14.S VT16.D | length 110.8
  Top Layer w1: VT14.S@-155.702,106.386 -155.702,103.997 -154.027,102.322 -132.278,102.322 -130.4,104.2 -130.4,106.8 -129.2,108 v2(-118,108)
  Top Layer w2: J10.2@-195.064,114.3 -191.429,114.3 VT16.D@-186.055,108.926 VT16.D@-165.862,108.926 -162.56,108.926 -160.02,106.386 VT14.S@-155.702,106.386
  Bottom Layer w0.6: v2(-118,108) -116.141,108 -115.85,108.291 -113.127,108.291 -112.649,108.769 C16.2@-112.649,112.644
  Bottom Layer w2: D45.2@-159.27,114.641 -158.75,114.121 -158.75,107.669 -157.578,106.497 -155.813,106.497 VT14.S@-155.702,106.386 -155.718,106.386 -155.829,106.275 D46.1@-155.829,103.211
NetC17_2: C17.2 J11.5 R116.1 SW1.3 SW1.4 U4.41 | length 130.3
  Top Layer w0.6: v1(-64.516,84.796) -61.825,82.105 v1(-61.825,61.875)
  Top Layer w0.8: v2(-83.439,29.805) -81.026,29.805 -78.652,27.431 -72.056,27.431 -64.135,19.51 v2(-64.135,6.945)
  Bottom Layer w0.3: v2(-83.439,29.805) -80.313,29.805 -80.137,29.981 -80.137,31.71 -75.692,36.155 -69.215,36.155 -61.825,43.545 v1(-61.825,61.875) ; U4.41@-70.677,75.251 -68.453,77.475 -68.453,80.859 v1(-64.516,84.796)
  Bottom Layer w0.6: v2(-91.059,29.805) -87.376,29.805 ; C17.2@-87.376,27.023 -87.376,29.805 ; R116.1@-87.376,30.751 -87.376,29.805 ; v2(-83.439,29.805) -87.376,29.805
NetC18_2: C18.2 J11.3 R117.1 SW2.3 SW2.4 U4.2 | length 84.9
  Top Layer w0.8: v2(-59.055,6.945) -59.055,29.336 -58.586,29.805 v2(-55.753,29.805)
  Bottom Layer w0.3: U4.2@-68.556,70.301 -65.779,67.524 -62.357,67.524 -58.547,63.714 -58.547,32.599 SW2.4@-56.134,30.186
  Bottom Layer w0.6: SW2.4@-56.134,30.186 v2(-55.753,29.805) -52.07,29.805 ; C18.2@-52.07,27.15 -52.07,29.805 ; R117.1@-52.07,30.786 -52.07,29.805 ; v2(-48.133,29.805) -52.07,29.805
NetC19_2: C19.2 J11.4 R118.1 SW3.3 SW3.4 U4.3 | length 86.7
  Top Layer w0.8: v2(-65.786,29.805) -62.064,29.805 -61.595,29.336 v2(-61.595,6.945)
  Bottom Layer w0.3: U4.3@-68.909,69.947 -65.978,67.016 -62.865,67.016 -59.182,63.333 -59.182,36.409 v2(-65.786,29.805)
  Bottom Layer w0.6: v2(-73.406,29.805) -69.723,29.805 ; R118.1@-69.723,30.659 -69.723,29.805 ; C19.2@-69.596,27.082 C19.2@-69.596,27.15 -69.596,29.805 ; v2(-65.786,29.805) -69.596,29.805 ; -69.723,29.805 -69.596,29.805
NetC20_1: C20.1 R30.1 R35.2 TP45.1 U4.20 | length 112.5
  Top Layer w0.6: -115.316,11.677 -113.502,11.677 -111.056,9.231 -100.244,9.231 -96.774,12.701 -96.774,16.089 -98.298,17.613 -98.298,32.677 -94.82,36.155 -90.52,36.155 -83.185,43.49 v1(-83.185,51.268)
  Top Layer w1: v2(-120.269,7.072) -119.921,7.072 -115.316,11.677 -115.316,17.105 v1(-119.253,21.042)
  Bottom Layer w0.3: v1(-83.185,51.268) -83.185,62.743 U4.20@-76.688,69.24
  Bottom Layer w1: R30.1@-120.409,21.042 v1(-119.253,21.042) R35.2@-117.789,21.042 -117.789,21.218 -117.463,21.544 C20.1@-117.463,23.328
NetC21_1: C21.1 R33.1 R36.2 TP46.1 U4.13 | length 90.8
  Top Layer w0.6: v1(-90.027,51.268) -85.852,51.268 -80.825,56.295 -80.825,58.025 v1(-76.85,62)
  Top Layer w1: TP46.1@-120.261,70.945 -119.805,70.945 -115.316,75.434 -115.316,80.986 v1(-119.253,84.923)
  Bottom Layer w0.3: v1(-76.85,62) -76.85,64.128 U4.13@-74.213,66.765
  Bottom Layer w0.6: v2(-120.269,70.699) -118.364,68.794 -98.806,68.794 -95.885,65.873 -95.885,57.102 -90.051,51.268 v1(-90.027,51.268)
  Bottom Layer w1: R33.1@-120.409,84.923 v1(-119.253,84.923) R36.2@-117.849,84.923 -117.849,85.099 -117.488,85.46 C21.1@-117.488,87.184
NetC22_1: C22.1 R110.1 R112.2 TP70.1 U4.18 | length 113.5
  Top Layer w0.6: v2(-120.269,102.195) -115.837,106.627 -115.837,113.257 v1(-119.253,116.673) ; v1(-86.45,90.175) -86.45,90.121 -86.25,89.921 -86.25,58.1 -84.925,56.775 v1(-81.665,56.775)
  Bottom Layer w0.3: v1(-81.665,56.775) -81.665,62.848 U4.18@-75.98,68.533
  Bottom Layer w0.6: v2(-120.269,102.195) -118.11,100.036 -94.742,100.036 -86.45,91.744 v1(-86.45,90.175)
  Bottom Layer w1: R110.1@-120.282,116.673 v1(-119.253,116.673) R112.2@-117.789,116.673 -117.789,116.849 -117.463,117.175 C22.1@-117.463,118.657
NetC23_1: C23.1 R108.1 R111.2 TP69.1 U4.19 | length 89.4
  Top Layer w0.6: v1(-92.71,37.679) -92.703,37.679 -86.357,44.025 v1(-86.35,44.025)
  Top Layer w1: TP69.1@-120.523,38.695 -120.269,38.695 -115.189,43.775 -115.189,48.982 v1(-119.126,52.919)
  Bottom Layer w0.3: v1(-86.35,44.025) -86.275,44.025 -82.315,47.985 -82.315,62.906 U4.19@-76.334,68.887
  Bottom Layer w0.6: TP69.1@-120.523,38.695 -120.345,38.695 -119.329,37.679 v1(-92.71,37.679)
  Bottom Layer w1: R108.1@-120.409,52.919 v1(-119.126,52.919) R111.2@-117.662,52.919 -117.584,52.997 -117.584,54.553 -117.361,54.776 -117.361,54.926 C23.1@-117.336,54.951
  other v2: -120.434,38.695
NetC28_2: C28.2 J5.1 R8.2 U3.6 Z1.1 | length 24.4
  Bottom Layer w0.6: U3.6@-63.836,119.34 -62.103,119.34 ; C28.2@-62.103,115.034 -62.103,119.34 ; J5.1@-53.5,124.42 -53.5,119.691 -53.851,119.34 -62.103,119.34
  Bottom Layer w1: Z1.1@-54.864,124.42 J5.1@-53.5,124.42
  Bottom Layer w1.2: J5.1@-53.5,124.42 -53.484,124.437 -53.484,127.938 -53.48,127.941 R8.2@-53.467,127.941
NetCR1_2: CR1.2 J2.2 J12.1 | length 27.5
  Top Layer w2: CR1.2@-13.208,56.602 -13.208,56.618 -14.097,57.507 J12.1@-14.097,62.571 -12.954,61.428 J2.2@-6.35,61.428
  Bottom Layer w2: J12.1@-14.097,62.571 -13.208,61.682 CR1.2@-13.208,56.618 ; -12.954,61.428 J2.2@-6.35,61.428
NetCR2_1: CR2.1 L1.1 TP1.1 U2.2 | length 33.7
  Top Layer w2: TP1.1@-36.068,61.301 -32.541,61.301 -31.369,62.473 -31.369,70.26 -32.541,71.432 CR2.1@-34.975,71.432 -34.975,75.081 -31.89,75.583 -31.048,75.657 -31.923,75.956 L1.1@-34.798,75.956
  Bottom Layer w1: TP1.1@-36.136,61.233 -35.872,61.233 TP1.1@-35.804,61.301 ; TP1.1@-36.068,61.301 TP1.1@-35.804,61.301 ; U2.2@-31.641,62.266 -34.839,62.266 TP1.1@-35.804,61.301
NetD3_1: D3.1 R6.1 R7.2 TP26.1 | length 8.4
  Bottom Layer w1: R6.1@-127.087,94.067 -127.087,94.102 -126.741,94.448 TP26.1@-124.46,94.448 ; D3.1@-124.968,97.496 -124.968,97.121 -124.46,96.613 TP26.1@-124.46,94.448 ; R7.2@-122.115,94.448 TP26.1@-124.46,94.448
  other v2: -124.46,94.5
NetD3_2: D3.2 R6.2 VT2.G | length 34.3
  Top Layer w0.75: VT2.G@-155.575,95.464 -155.575,97.478 -154.118,98.935 -131.858,98.935 v1(-128.705,95.782)
  Top Layer w1: v1(-128.705,95.782) v1@-128.651,95.835
  Bottom Layer w1: D3.2@-128.718,97.496 -128.705,97.482 v1(-128.705,95.782) -128.705,94.081 R6.2@-128.691,94.067
NetD4_1: D4.1 R11.1 R14.2 TP25.1 | length 11.6
  Bottom Layer w1: R11.1@-126.833,30.186 -126.833,30.221 -126.737,30.317 -125.058,30.317 -124.554,30.821 v2(-124.206,30.821) ; R14.2@-121.954,30.44 -121.954,30.49 -122.004,30.54 -122.054,30.54 -122.089,30.575 -123.96,30.575 v2(-124.206,30.821) ; D4.1@-124.619,33.242 -124.452,33.075 TP25.1@-124.452,31.415 ; D4.1@-124.619,33.242 -124.744,33.367 D4.1@-124.744,33.742 -124.619,33.617 D4.1@-124.619,33.242 ; D4.1@-124.619,33.242 -124.619,31.582 TP25.1@-124.452,31.415 ; TP25.1@-124.452,31.415 -124.206,31.169 v2(-124.206,30.821) ; TP25.1@-124.452,31.415 -124.452,31.067 v2(-124.206,30.821)
NetD4_2: D4.2 R11.2 VT1.G | length 37
  Top Layer w0.75: VT1.G@-155.702,31.583 -155.702,34.7 -155.263,35.139 -128.963,35.139 -128.397,34.573 v1(-128.397,31.964)
  Bottom Layer w0.75: D4.2@-128.494,33.742 -128.494,30.47 -128.437,30.413 R11.2@-128.437,30.186
NetD5_1: D5.1 R15.1 R16.2 TP30.1 | length 7.9
  Bottom Layer w1: R16.2@-126.711,91.303 -126.608,91.2 -124.709,91.2 TP30.1@-124.509,91 ; D5.1@-124.998,88.225 -124.873,88.35 -124.873,88.725 -124.549,89.049 -124.549,90.951 -124.285,91.215 -122.185,91.215 -122.082,91.318 R15.1@-122.082,91.4
  other v2: -124.5,91
NetD5_2: D5.2 R16.1 VT3.G | length 45.3
  Top Layer w0.75: VT3.G@-165.862,90.384 -163.195,90.384 -159.258,86.447 -129.217,86.447 -128.778,86.886 v1(-128.778,90.13)
  Bottom Layer w1: R16.1@-128.813,91.4 -128.78,91.368 -128.78,88.257 D5.2@-128.748,88.225
NetD7_1: D7.1 R25.1 R28.2 TP29.1 | length 8.6
  Bottom Layer w1: R28.2@-126.584,27.138 -126.584,27.051 -126.481,26.948 -124.524,26.948 v2(-124.333,26.757) ; D7.1@-124.871,23.582 -124.871,25.871 -124.333,26.409 v2(-124.333,26.757) ; R25.1@-121.701,27.011 -121.701,26.987 -121.804,26.884 -124.206,26.884 v2(-124.333,26.757)
NetD7_2: D7.2 R28.1 VT4.G | length 44.7
  Top Layer w0.75: VT4.G@-165.862,26.503 -163.449,26.503 -159.595,22.649 -129.408,22.649 -128.651,23.406 v1(-128.651,25.36)
  Bottom Layer w1: R28.1@-128.686,27.138 -128.686,25.395 v1(-128.651,25.36) -128.651,23.612 D7.2@-128.621,23.582
NetD8_1: D8.1 R19.1 R21.2 TP36.1 | length 8.5